# Altium PCB 6-layer.PcbDoc (part 1 of 2)
Units mm, origin at the board's own origin, x right, y up, seen from the top; angles counter-clockwise.
Board outline 36 x 29 mm, 6 copper layers (Top Layer, GND1, L3, L4, GND2, Bottom Layer), stack 0.804 mm thick; 122 components, 171 nets, 723 pads, 118 vias.
Unrouted connection lines stored in the file: 463.
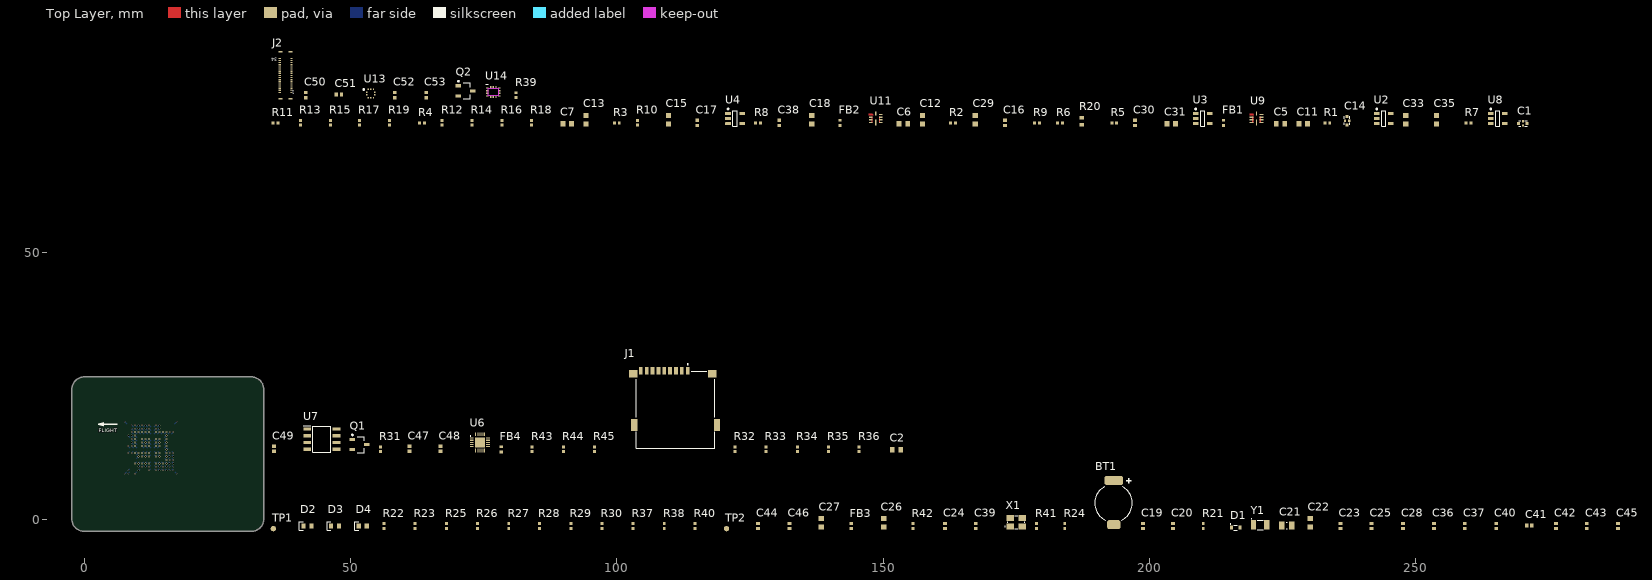
[diagram p0: Top Layer view]
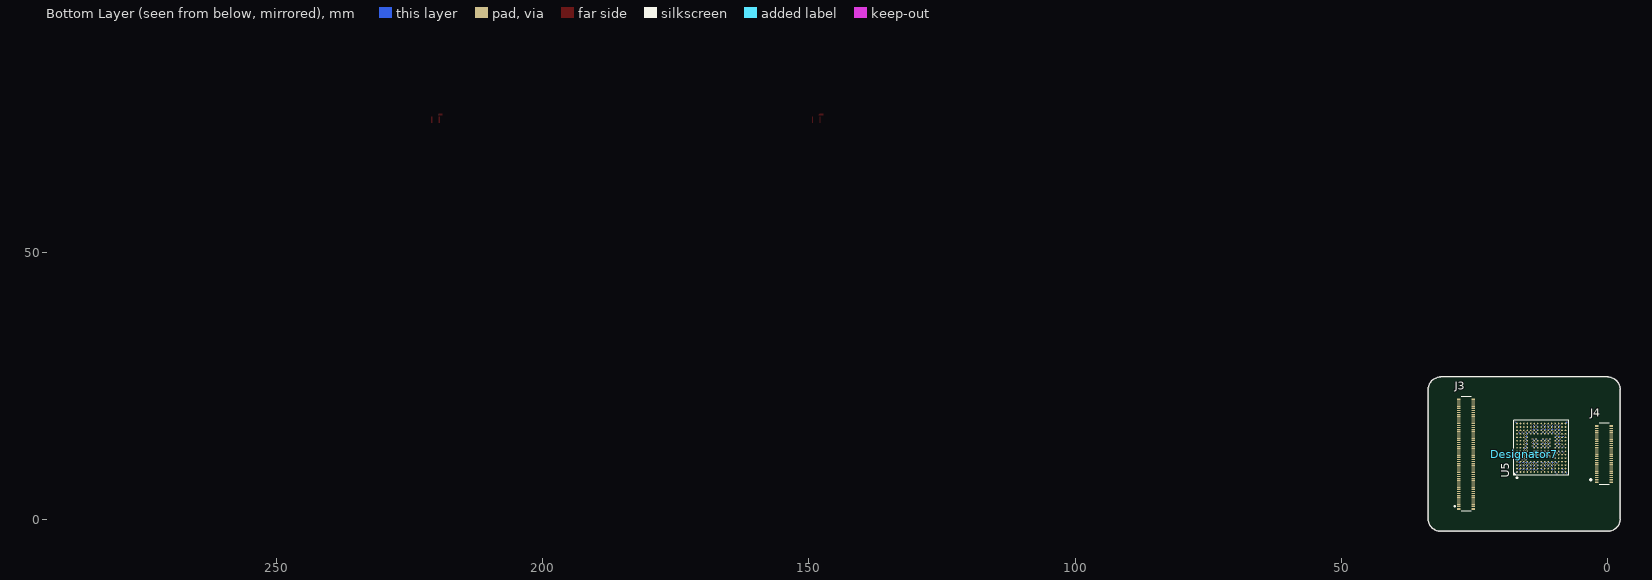
[diagram p1: Bottom Layer view, seen from below]
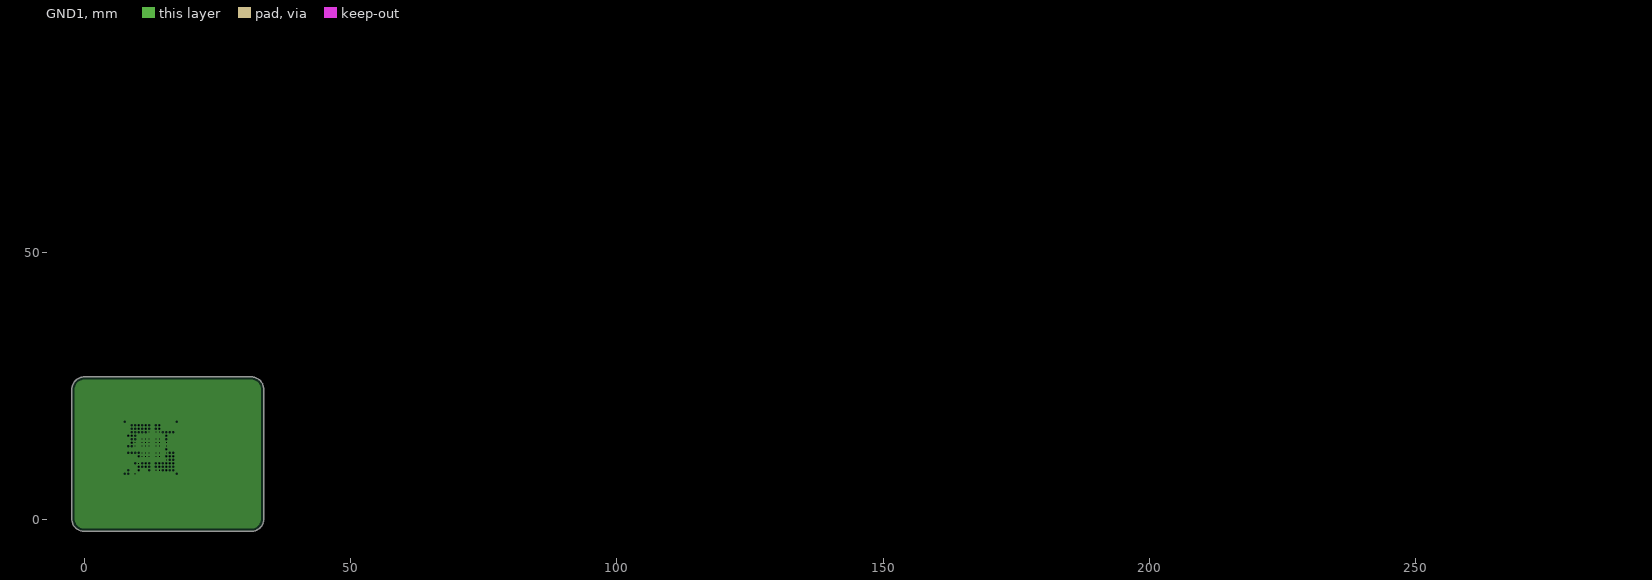
[diagram p2: GND1, clearances drawn from the general rule]
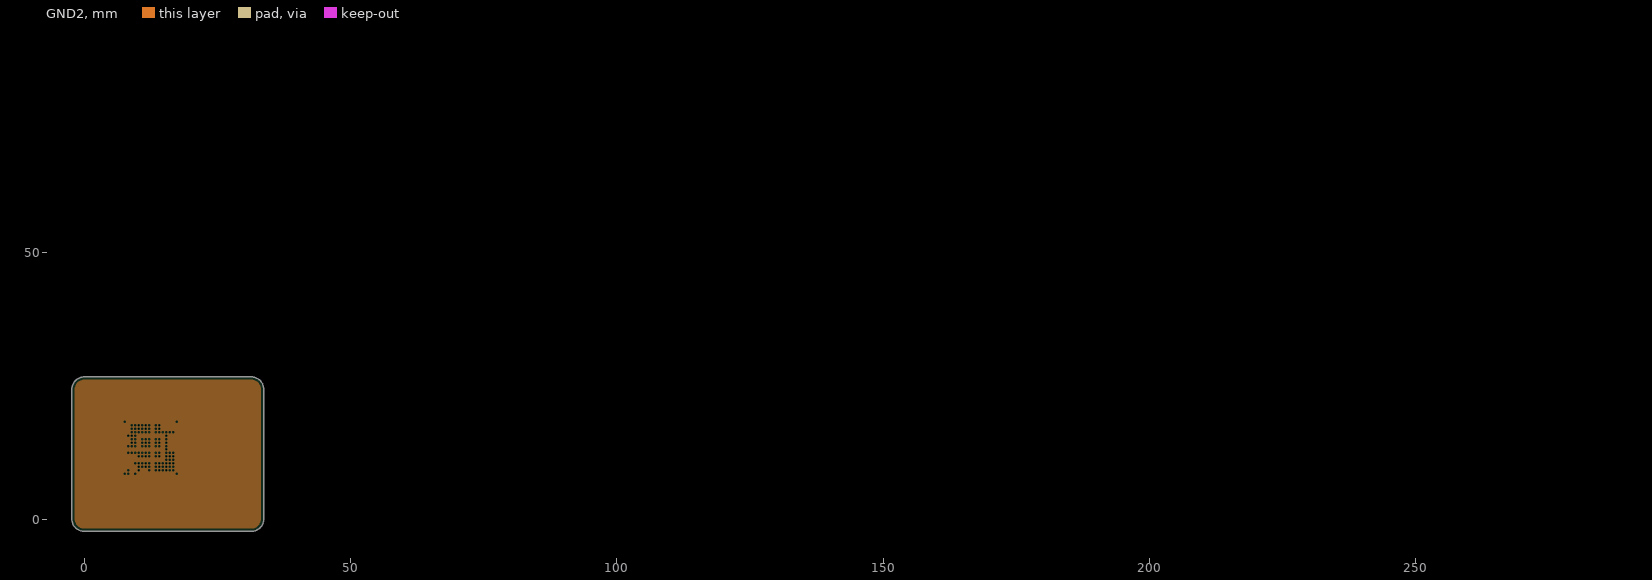
[diagram p3: GND2, clearances drawn from the general rule]

## Layer stack, top to bottom
Top Solder: solder mask 0.0152, Solder Resist, Dk 3.8
Top Layer: signal copper 0.035
Dielectric 1: prepreg 0.0764, NP-155F, Dk 3.91
GND1: plane copper 0.0152, net GND
Dielectric 2: core 0.075, NP-155F, Dk 3.99
L3: signal copper 0.0152
Dielectric 3: prepreg 0.0764, NP-155F, Dk 3.91
Dielectric 4: prepreg 0.218, NP-155F, Dk 4.4
Dielectric 5: prepreg 0.0764, NP-155F, Dk 3.91
L4: signal copper 0.0152
Dielectric 6: core 0.075, NP-155F, Dk 3.99
GND2: plane copper 0.0152
Dielectric 7: prepreg 0.0764, NP-155F, Dk 3.91
Bottom Layer: signal copper 0.035
Bottom Solder: solder mask 0.0152, Solder Resist, Dk 3.8

## Board outline
31.4,-2.3 ccw(c31.4,0) 33.7,0 33.7,24.4 ccw(c31.4,24.4) 31.4,26.7 0,26.7 ccw(c0,24.4) -2.3,24.4 -2.3,0 ccw(c0,0) 0,-2.3

## Design rules (kind name [scope] priority, off if disabled: settings)
Clearance Clearance_1 [WithinRoom(Room_BGA) AND IsVia vs WithinRoom(Room_BGA) AND OnBottomLayer] p1: gap=0.1 ignorepadtopadclearanceinfootprint=TRUE
Clearance Clearance_Clock [(InNet('ETH_REF_CLK') OR InNet('SPI1_SCK_SENSOR1_BMI330') OR InNet('SPI2_SCK_SENSOR2_ISM330') OR InNet('SPI3_SCK_SENSOR3_BMI088') OR InNet('SPI4_SCK_SENSOR4') OR InNet('SPI5_SCK_FRAM') OR InNet('SPI6_SCK_EXTERNAL1'))] p2: gap=0.32 ignorepadtopadclearanceinfootprint=TRUE
Clearance Clearance_High_Speed [(InNetClass('ETH_RMII_RX') OR InNetClass('ETH_RMII_TX') OR InNetClass('SDMMC') OR InNetClass('USB'))] p3: gap=0.22 ignorepadtopadclearanceinfootprint=TRUE
Clearance [All] p4: gap=0.16 ignorepadtopadclearanceinfootprint=TRUE
ComponentClearance ComponentClearanceMechanical [InComponent('Designator7')] p1: gap=-1 collisioncheckmode=3 verticalgap=-1 showdistances=FALSE
ComponentClearance [All] p2: gap=0.254 collisioncheckmode=3 verticalgap=0.254 showdistances=FALSE
DiffPairsRouting [InDifferentialPair('USB_D')] p1: maxlimit=0.13 minlimit=0.127 mostfreqgap=0.13 toplayer_mingap=0.13 toplayer_minwidth=0.1 toplayer_maxwidth=0.1 toplayer_prefwidth=0.1 midlayer1_minwidth=0.381 midlayer1_maxwidth=0.381 midlayer1_prefwidth=0.381 midlayer4_maxgap=0.127 midlayer4_prefgap=0.127 midlayer4_minwidth=0.087 midlayer4_maxwidth=0.381 midlayer4_prefwidth=0.113 bottomlayer_mingap=0.13 bottomlayer_minwidth=0.1 bottomlayer_maxwidth=0.1 bottomlayer_prefwidth=0.1 maxuncoupledlength=12.7
HoleToHoleClearance ViaHoleToHoleClearance [IsVia vs IsVia] p1: gap=0.2 allowstackedmicrovias=TRUE
HoleToHoleClearance [IsThruPin vs IsThruPin] p2: gap=0.45 allowstackedmicrovias=FALSE
MatchedLengths MatchedLengths_ETH_RX [InNetClass('ETH_RMII_RX')] p1: tolerance=1.27 checknetsindiffpair=FALSE checkdiffpairvsdiffpair=TRUE checkxsignals=TRUE checkothers=TRUE usedelayunits=TRUE delaytolerance=10.000000
MatchedLengths MatchedLengths_ETH_TX [InNetClass('ETH_RMII_TX')] p2: tolerance=1.27 checknetsindiffpair=FALSE checkdiffpairvsdiffpair=TRUE checkxsignals=TRUE checkothers=TRUE usedelayunits=TRUE delaytolerance=10.000000
MatchedLengths MatchedLengths_SDMMC [InNetClass('SDMMC')] p3: tolerance=1.27 checknetsindiffpair=FALSE checkdiffpairvsdiffpair=TRUE checkxsignals=TRUE checkothers=TRUE usedelayunits=TRUE delaytolerance=30.000000
MinimumSolderMaskSliver [All] p1: minsoldermaskwidth=0.1
PlaneClearance [All] p1: clearance=0.16
PlaneConnect [All] p1: planeconnectstyle=Direct reliefexpansion=0.508 reliefentries=4 reliefconductorwidth=0.254 reliefairgap=0.254
PolygonConnect [All] p1: connectstyle=Direct reliefconductorwidth=0.15 reliefentries=4 polygonreliefangle="45 Angle" airgapwidth=0.15
RoomDefinition Room_BGA [False vs False] p1: confinementstyle=ConfineIn formatcopy=TRUE lockcomponents=FALSE outline 7.625,18.275 17.375,18.275 17.375,8.525 7.625,8.525
RoutingVias [All] p1: holewidth=0.15 width=0.35 viastyle="Through Hole" minholewidth=0.15 minwidth=0.25 maxholewidth=0.2 maxwidth=0.35
SolderMaskExpansion [IsPad] p1: expansion=0.03 istentingtop=FALSE
SolderMaskExpansion SolderMaskExpansion_Vias [IsVia] p2: expansion=0.1 istentingtop=TRUE useseparateexpansions=TRUE expansionbottom=0.1 istentingbottom=TRUE
SolderMaskExpansion SolderMaskExpansion_1 [All] p3: expansion=0 istentingtop=FALSE
SupplyNets "Schematic Supply Nets_7" [InNet('VDD_3V3_SENSORS3')] p1: voltage=0.000
SupplyNets "Schematic Supply Nets_6" [InNet('FMU_VDD_3V3')] p2: voltage=0.000
SupplyNets "Schematic Supply Nets_5" [InNet('VDD_3V3_SD_CARD')] p3: voltage=0.000
SupplyNets "Schematic Supply Nets_4" [InNet('VDD_3V3_SENSORS2')] p4: voltage=0.000
SupplyNets "Schematic Supply Nets_3" [InNet('VDD_3V3_SENSORS1')] p5: voltage=0.000
SupplyNets "Schematic Supply Nets_2" [InNet('GND')] p6: voltage=0.000
SupplyNets "Schematic Supply Nets_1" [InNet('VDD_5V_IN')] p7: voltage=0.000
SupplyNets "Schematic Supply Nets" [InNet('VDD_3V3_SENSORS4')] p8: voltage=0.000
Width Width_Power [All] p1: maxlimit=0.5 minlimit=0.2 preferedwidth=0.2
Width [All] p2: maxlimit=0.5 minlimit=0.1 preferedwidth=0.107
24 further rules are at their usual default settings.

## Classes and differential pairs
net class UART4: UART4_RX UART4_TX
net class SPI5: SPI5_MISO_FRAM SPI5_MOSI_FRAM SPI5_nCS1_FRAM SPI5_SCK_FRAM
net class I2C4: I2C4_SCL_FMU I2C4_SDA_FMU
net class Power: FMU_VDD_3V3 FMU_VDD_5V SENSORS_VDD_5V VDD_3V3_SD_CARD VDD_3V3_SD_CARD_EN VDD_3V3_SENSORS1 VDD_3V3_SENSORS1_EN VDD_3V3_SENSORS2 VDD_3V3_SENSORS2_EN VDD_3V3_SENSORS3 VDD_3V3_SENSORS3_EN VDD_3V3_SENSORS4 VDD_3V3_SENSORS4_EN VDD_5V_IN
net class SPI1: SPI1_DRDY1_BMI330 SPI1_MISO_SENSOR1_BMI330 SPI1_MOSI_SENSOR1_BMI330 SPI1_nCS1_BMI330 SPI1_SCK_SENSOR1_BMI330
net class ETH_RMII_RX: ETH_CRS_DV ETH_RXD0 ETH_RXD1
net class ETH_RMII_SLOW: ETH_MDC ETH_MDIO ETH_POWER_EN
net class SDMMC: SDMMC2_CLK SDMMC2_CMD SDMMC2_D0 SDMMC2_D1 SDMMC2_D2 SDMMC2_D3
net class USB: USB_D_N USB_D_P
net class USART6: USART6_RX_FROM_IO__RC_INPUT USART6_TX_TO_IO__NC
net class USART3: USART3_RX_DEBUG USART3_TX_DEBUG
net class USART2: USART2_CTS_TELEM3 USART2_RTS_TELEM3 USART2_RX_TELEM3 USART2_TX_TELEM3
net class USART1: USART1_RX_GPS1 USART1_TX_GPS1
net class UART8: UART8_RX_GPS2 UART8_TX_GPS2
net class UART7: UART7_CTS_TELEM1 UART7_RTS_TELEM1 UART7_RX_TELEM1 UART7_TX_TELEM1
net class UART5: UART5_CTS_TELEM2 UART5_RTS_TELEM2 UART5_RX_TELEM2 UART5_TX_TELEM2
net class SPI6: SPI6_DRDY1_EXTERNAL1 SPI6_DRDY2_EXTERNAL1 SPI6_MISO_EXTERNAL1 SPI6_MOSI_EXTERNAL1 SPI6_nCS1_EXTERNAL1 SPI6_nCS2_EXTERNAL1 SPI6_nRESET_EXTERNAL1 SPI6_SCK_EXTERNAL1 SPIX_SYNC
net class SPI4: SPI4_DRDY1 SPI4_MISO_SENSOR4 SPI4_MOSI_SENSOR4 SPI4_nCS1 SPI4_SCK_SENSOR4
net class SPI3: SPI3_DRDY2_BMI088_INT3_GYRO SPI3_MISO_SENSOR3_BMI088 SPI3_MOSI_SENSOR3_BMI088 SPI3_nCS1_BMI088_ACCEL SPI3_nCS2_BMI088_GYRO SPI3_SCK_SENSOR3_BMI088
net class SPI2: SPI2_DRDY2_ISM330_INT2 SPI2_MISO_SENSOR2_ISM330 SPI2_MOSI_SENSOR2_ISM330 SPI2_nCS1_ISM330 SPI2_SCK_SENSOR2_ISM330
net class PWM: FMU_CH1 FMU_CH2 FMU_CH3 FMU_CH4 FMU_CH5 FMU_CH6 FMU_CH7 FMU_CH8
net class I2C3: I2C3_SCL_EXTERNAL1 I2C3_SDA_EXTERNAL1
net class I2C2: I2C2_SCL_BASE_GPS2_MAG_LED_PM2 I2C2_SDA_BASE_GPS2_MAG_LED_PM2
net class I2C1: I2C1_SCL_BASE_GPS1_MAG_LED_PM1 I2C1_SDA_BASE_GPS1_MAG_LED_PM1
net class ETH_RMII_TX: ETH_REF_CLK ETH_TX_EN ETH_TXD0 ETH_TXD1
net class CAN2: CAN2_RX CAN2_TX
net class CAN1: CAN1_RX CAN1_TX
component class Sensors: C50 C51 C52 C53 J2 Q2 R39 U13 U14
component class PAB: J3 J4
component class Memory: C2 C47 C48 C49 FB4 J1 Q1 R31 R32 R33 R34 R35 R36 R43 R44 R45 U6 U7
component class "FMU MCU": BT1 C19 C20 C21 C22 C23 C24 C25 C26 C27 C28 C36 C37 C39 C40 C41 C42 C43 C44 C45 C46 D1 D2 D3 D4 FB3 R21 R22 R23 R24 R25 R26 R27 R28 R29 R30 R37 R38 R40 R41 R42 TP1 TP2 U5 X1 Y1
component class Power: C1 C5 C6 C7 C11 C12 C13 C14 C15 C16 C17 C18 C29 C30 C31 C33 C35 C38 FB1 FB2 R1 R2 R3 R4 R5 R6 R7 R8 R9 R10 R11 R12 R13 R14 R15 R16 R17 R18 R19 R20 U2 U3 U4 U8 U9 U11
differential pair USB_D: +USB_D_P -USB_D_N

## Components (designator, comment, footprint, x,y, rotation, side; value= is the part's Value field where it differs from the comment)
BT1 "MS621FE-FL11E" MS621R 193.311,3.008 r90 top
C1 "NFM18PC104R1C3D" NFM18PC104R1C3_0603_NO_VIA 270.111,74.308 r0 top
C2 "10uF" CAPC1608X10N 152.511,13.008 r0 top
C5 "10uF" CAPC1608X10N 224.611,74.208 r0 top
C6 "10uF" CAPC1608X10N 153.811,74.208 r0 top
C7 "10uF" CAPC1608X10N 90.712,74.208 r0 top
C11 "10uF" CAPC1608X10N 228.911,74.208 r0 top
C12 "10uF" CAPC1608X10N 157.411,75.008 r90 top
C13 "10uF" CAPC1608X10N 94.212,75.008 r90 top
C14 "NFM18PC104R1C3D" NFM18PC104R1C3_0603_NO_VIA 237.111,74.808 r90 top
C15 "22uF" CAPC1608X10N 109.712,75.008 r90 top
C16 "0.1uF" CAPC1005X05N 172.911,74.408 r90 top
C17 "0.1uF" CAPC1005X05N 115.112,74.408 r90 top
C18 "22uF" CAPC1608X10N 136.611,75.008 r90 top
C19 "18pF/C0G" CAPC1005X05N 198.811,-1.292 r90 top
C20 "18pF/C0G" CAPC1005X05N 204.411,-1.292 r90 top
C21 "47uF" CAPC2012X14N 225.811,-1.192 r0 top
C22 "4.7uF" CAPC1608X10N 230.211,-0.692 r90 top
C23 "100nF" CAPC1005X05N 235.911,-1.292 r90 top
C24 "22pF/C0G" CAPC1005X05N 161.611,-1.292 r90 top
C25 "1uF" CAPC1005X05N 241.711,-1.292 r90 top
C26 "2.2uF/10V" CAPC1608X10N 150.111,-0.692 r90 top
C27 "2.2uF/10V" CAPC1608X10N 138.411,-0.692 r90 top
C28 "100nF" CAPC1005X05N 247.611,-1.292 r90 top
C29 "22uF" CAPC1608X10N 167.311,75.008 r90 top
C30 "0.1uF" CAPC1005X05N 197.311,74.408 r90 top
C31 "22uF" CAPC1608X10N 204.111,74.208 r0 top
C33 "10uF" CAPC1608X10N 248.111,75.008 r90 top
C35 "10uF" CAPC1608X10N 253.911,75.008 r90 top
C36 "1uF" CAPC1005X05N 253.411,-1.292 r90 top
C37 "100nF" CAPC1005X05N 259.211,-1.292 r90 top
C38 "0.1uF" CAPC1005X05N 130.511,74.408 r90 top
C39 "22pF/C0G" CAPC1005X05N 167.411,-1.292 r90 top
C40 "1uF" CAPC1005X05N 265.111,-1.292 r90 top
C41 "100nF" CAPC1005X05N 271.311,-1.192 r0 top
C42 "1uF" CAPC1005X05N 276.311,-1.292 r90 top
C43 "100nF" CAPC1005X05N 282.111,-1.292 r90 top
C44 "100nF" CAPC1005X05N 126.511,-1.292 r90 top
C45 "1uF" CAPC1005X05N 288.011,-1.292 r90 top
C46 "1uF" CAPC1005X05N 132.411,-1.292 r90 top
C47 "0.1uF" CAPC1005X05N 61.112,13.208 r90 top
C48 "0.1uF" CAPC1005X05N 66.912,13.208 r90 top
C49 "100n" CAPC1005X05N 35.612,13.208 r90 top
C50 "100nF" CAPC1005X05N 41.612,79.608 r90 top
C51 "100nF" CAPC1005X05N 47.812,79.708 r0 top
C52 "100nF" CAPC1005X05N 58.312,79.608 r90 top
C53 "100nF" CAPC1005X05N 64.212,79.608 r90 top
D1 "SOD-523" SODFL160X70-2N 216.211,-1.592 r0 top
D2 "RED" LED_0603_RED 41.912,-1.292 r0 top
D3 "GREEN" LED_0603_GREEN 47.112,-1.292 r0 top
D4 "BLUE" LED_0603_BLUE 52.312,-1.292 r0 top
Designator7 "Comment" PAB_LandPattern 15.7,12.2 r90 bottom locked
FB1 "120R@100M" INDC1005X06N 213.911,74.408 r90 top
FB2 "120R@100M" INDC1005X06N 141.911,74.408 r90 top
FB3 "60R@100M/300mA" INDC1005X06N 144.011,-1.292 r90 top
FB4 "120R@100M" INDC1005X06N 78.312,13.108 r90 top
J1 "TF-15x15" TF15X15 111.112,20.708 r0 top
J2 "BM20B(0.8)-34DS-0.4V" BM20B(0.8)-34DS-0.4V 37.812,83.308 r90 top
J3 "CONN HDR 100POS 0.4MM SMD GOLD" HIROSE_DF40C-100DP-0_4V51 26.6,12.2 r90 bottom
J4 "CONN HDR 50POS 0.4MM SMD GOLD" HIROSE_DF40C-50DP-0-4V51 0.7,12.2 r90 bottom
Q1 "AO3400A" SOT95P280X125-3N 51.712,14.008 r0 top
Q2 "AO3400A" SOT95P280X125-3N 71.612,80.408 r0 top
R1 "10K" RESC1005X04N 233.411,74.408 r0 top
R2 "10K" RESC1005X04N 163.111,74.408 r0 top
R3 "10K" RESC1005X04N 100.012,74.408 r0 top
R4 "10K" RESC1005X04N 63.412,74.408 r0 top
R5 "82K" RESC1005X04N 193.411,74.408 r0 top
R6 "18K" RESC1005X04N 183.211,74.408 r0 top
R7 "10K" RESC1005X04N 259.911,74.408 r0 top
R8 "82K" RESC1005X04N 126.511,74.408 r0 top
R9 "10K" RESC1005X04N 178.911,74.408 r0 top
R10 "18K" RESC1005X04N 103.912,74.408 r90 top
R11 "10K" RESC1005X04N 35.912,74.408 r0 top
R12 "10K" RESC1005X04N 67.212,74.408 r90 top
R13 "10K" RESC1005X04N 40.612,74.408 r90 top
R14 "10K" RESC1005X04N 72.812,74.408 r90 top
R15 "10K" RESC1005X04N 46.212,74.408 r90 top
R16 "10K" RESC1005X04N 78.412,74.408 r90 top
R17 "10K" RESC1005X04N 51.712,74.408 r90 top
R18 "10K" RESC1005X04N 84.012,74.408 r90 top
R19 "10K" RESC1005X04N 57.312,74.408 r90 top
R20 "220R" RESC1608X06N 187.311,74.708 r90 top
R21 "1K5" RESC1005X04N 210.111,-1.292 r90 top
R22 "1.5K" RESC1005X04N 56.312,-1.292 r90 top
R23 "1.5K" RESC1005X04N 62.112,-1.292 r90 top
R24 "10K" RESC1005X04N 184.111,-1.292 r90 top
R25 "1.5K" RESC1005X04N 68.012,-1.292 r90 top
R26 "1.5K" RESC1005X04N 73.812,-1.292 r90 top
R27 "1.5K" RESC1005X04N 79.712,-1.292 r90 top
R28 "1.5K" RESC1005X04N 85.512,-1.292 r90 top
R29 "1.5K" RESC1005X04N 91.412,-1.292 r90 top
R30 "1.5K" RESC1005X04N 97.212,-1.292 r90 top
R31 "2K" RESC1005X04N 55.612,13.108 r90 top
R32 "100K" RESC1005X04N 122.212,13.108 r90 top
R33 "100K" RESC1005X04N 128.011,13.108 r90 top
R34 "100K" RESC1005X04N 133.911,13.108 r90 top
R35 "100K" RESC1005X04N 139.711,13.108 r90 top
R36 "100K" RESC1005X04N 145.511,13.108 r90 top
R37 "1K5" RESC1005X04N 103.012,-1.292 r90 top
R38 "1K5" RESC1005X04N 108.912,-1.292 r90 top
R39 "2K" RESC1005X04N 81.112,79.608 r90 top
R40 "1K5" RESC1005X04N 114.712,-1.292 r90 top
R41 "R0402" RESC1005X04N 178.811,-1.292 r90 top
R42 "R0402" RESC1005X04N 155.611,-1.292 r90 top
R43 "2K" RESC1005X04N 84.112,13.108 r90 top
R44 "2K" RESC1005X04N 90.012,13.108 r90 top
R45 "2K" RESC1005X04N 95.812,13.108 r90 top
TP1 "TP_NOBOM" PAD_RND_1MM 35.512,-1.792 r90 top
TP2 "TP_NOBOM" PAD_RND_1MM 120.612,-1.792 r90 top
U2 "LP5907-3.3" SOT-23-5 244.011,75.208 r0 top
U3 "LP5907-3.3" SOT-23-5 210.011,75.208 r0 top
U4 "LP5907-3.3" SOT-23-5 122.212,75.208 r0 top
U5 "STM32H753IIK6" BGA176C65P15X15_1000X1000X60N 12.5,13.4 r90 bottom locked
U6 "SE050C2HQ1/Z01SDZ" "SOT1969-1 NXP" 74.312,14.408 r0 top
U7 "FM25V02A-G" SOT127P602X155-8N 44.612,15.008 r0 top
U8 "LP5907-3.3" SOT-23-5 265.411,75.208 r0 top
U9 "MPM3811" QFN2x2x1p6_MPM3811_MNP 220.111,75.208 r0 top
U11 "MPM3811" QFN2x2x1p6_MPM3811_MNP 148.611,75.208 r0 top
U13 "ICP-20100" BMP390 53.812,79.908 r0 top
U14 "BMI330" ICM-45686 76.812,80.208 r0 top
X1 "16MHz 15pF" OSCCC320X250X80 175.011,-0.592 r0 top
Y1 "32.768Khz 12.5pF" XTAL3215X80N-2N 220.811,-1.092 r0 top

## Footprints (in the part's own frame and the unit in brackets; to place one, negate y for a bottom-side part, rotate by r counter-clockwise, add the part's x,y. Pads: shape width x height; smd on the part's side, far side on the other; paste and mask are expansions set on the pad)
BGA176C65P15X15_1000X1000X60N [mm] "BGA, 176-Leads, Body 10.00x10.00mmx0.60mm, Pitch 0.65mm"
  round 0.3 smd: A1(-4.55,4.55) A2(-3.9,4.55) A3(-3.25,4.55) A4(-2.6,4.55) A5(-1.95,4.55) A6(-1.3,4.55) A7(-0.65,4.55) A8(0,4.55) A9(0.65,4.55) A10(1.3,4.55) A11(1.95,4.55) A12(2.6,4.55) A13(3.25,4.55) A14(3.9,4.55) A15(4.55,4.55) B1(-4.55,3.9) B2(-3.9,3.9) B3(-3.25,3.9) B4(-2.6,3.9) B5(-1.95,3.9) B6(-1.3,3.9) B7(-0.65,3.9) B8(0,3.9) B9(0.65,3.9) B10(1.3,3.9) B11(1.95,3.9) B12(2.6,3.9) B13(3.25,3.9) B14(3.9,3.9) B15(4.55,3.9) C1(-4.55,3.25) C2(-3.9,3.25) C3(-3.25,3.25) C4(-2.6,3.25) C5(-1.95,3.25) C6(-1.3,3.25) C7(-0.65,3.25) C8(0,3.25) C9(0.65,3.25) C10(1.3,3.25) C11(1.95,3.25) C12(2.6,3.25) C13(3.25,3.25) C14(3.9,3.25) C15(4.55,3.25) D1(-4.55,2.6) D2(-3.9,2.6) D3(-3.25,2.6) D4(-2.6,2.6) D5(-1.95,2.6) D6(-1.3,2.6) D7(-0.65,2.6) D8(0,2.6) D9(0.65,2.6) D10(1.3,2.6) D11(1.95,2.6) D12(2.6,2.6) D13(3.25,2.6) D14(3.9,2.6) D15(4.55,2.6) E1(-4.55,1.95) E2(-3.9,1.95) E3(-3.25,1.95) E4(-2.6,1.95) E12(2.6,1.95) E13(3.25,1.95) E14(3.9,1.95) E15(4.55,1.95) F1(-4.55,1.3) F2(-3.9,1.3) F3(-3.25,1.3) F4(-2.6,1.3) F6(-1.3,1.3) F7(-0.65,1.3) F8(0,1.3) F9(0.65,1.3) F10(1.3,1.3) F12(2.6,1.3) F13(3.25,1.3) F14(3.9,1.3) F15(4.55,1.3) G1(-4.55,0.65) G2(-3.9,0.65) G3(-3.25,0.65) G4(-2.6,0.65) G6(-1.3,0.65) G7(-0.65,0.65) G8(0,0.65) G9(0.65,0.65) G10(1.3,0.65) G12(2.6,0.65) G13(3.25,0.65) G14(3.9,0.65) G15(4.55,0.65) H1(-4.55,0) H2(-3.9,0) H3(-3.25,0) H4(-2.6,0) H6(-1.3,0) H7(-0.65,0) H8(0,0) H9(0.65,0) H10(1.3,0) H12(2.6,0) H13(3.25,0) H14(3.9,0) H15(4.55,0) J1(-4.55,-0.65) J2(-3.9,-0.65) J3(-3.25,-0.65) J4(-2.6,-0.65) J6(-1.3,-0.65) J7(-0.65,-0.65) J8(0,-0.65) J9(0.65,-0.65) J10(1.3,-0.65) J12(2.6,-0.65) J13(3.25,-0.65) J14(3.9,-0.65) J15(4.55,-0.65) K1(-4.55,-1.3) K2(-3.9,-1.3) K3(-3.25,-1.3) K4(-2.6,-1.3) K6(-1.3,-1.3) K7(-0.65,-1.3) K8(0,-1.3) K9(0.65,-1.3) K10(1.3,-1.3) K12(2.6,-1.3) K13(3.25,-1.3) K14(3.9,-1.3) K15(4.55,-1.3) L1(-4.55,-1.95) L2(-3.9,-1.95) L3(-3.25,-1.95) L4(-2.6,-1.95) L12(2.6,-1.95) L13(3.25,-1.95) L14(3.9,-1.95) L15(4.55,-1.95) M1(-4.55,-2.6) M2(-3.9,-2.6) M3(-3.25,-2.6) M4(-2.6,-2.6) M5(-1.95,-2.6) M6(-1.3,-2.6) M7(-0.65,-2.6) M8(0,-2.6) M9(0.65,-2.6) M10(1.3,-2.6) M11(1.95,-2.6) M12(2.6,-2.6) M13(3.25,-2.6) M14(3.9,-2.6) M15(4.55,-2.6) N1(-4.55,-3.25) N2(-3.9,-3.25) N3(-3.25,-3.25) N4(-2.6,-3.25) N5(-1.95,-3.25) N6(-1.3,-3.25) N7(-0.65,-3.25) N8(0,-3.25) N9(0.65,-3.25) N10(1.3,-3.25) N11(1.95,-3.25) N12(2.6,-3.25) N13(3.25,-3.25) N14(3.9,-3.25) N15(4.55,-3.25) P1(-4.55,-3.9) P2(-3.9,-3.9) P3(-3.25,-3.9) P4(-2.6,-3.9) P5(-1.95,-3.9) P6(-1.3,-3.9) P7(-0.65,-3.9) P8(0,-3.9) P9(0.65,-3.9) P10(1.3,-3.9) P11(1.95,-3.9) P12(2.6,-3.9) P13(3.25,-3.9) P14(3.9,-3.9) P15(4.55,-3.9) R1(-4.55,-4.55) R2(-3.9,-4.55) R3(-3.25,-4.55) R4(-2.6,-4.55) R5(-1.95,-4.55) R6(-1.3,-4.55) R7(-0.65,-4.55) R8(0,-4.55) R9(0.65,-4.55) R10(1.3,-4.55) R11(1.95,-4.55) R12(2.6,-4.55) R13(3.25,-4.55) R14(3.9,-4.55) R15(4.55,-4.55)
  silkscreen extent -5.75,-5.15 5.15,5.15, body extent -5,-5 5,5, height 0.49
BM20B(0.8)-34DS-0.4V [mm]
  rect 0.23x0.42 smd: 1(-3.2,-1.09) 2(-3.2,1.09) 3(-2.8,-1.09) 4(-2.8,1.09) 5(-2.4,-1.09) 6(-2.4,1.09) 7(-2,-1.09) 8(-2,1.09) 9(-1.6,-1.09) 10(-1.6,1.09) 11(-1.2,-1.09) 12(-1.2,1.09) 13(-0.8,-1.09) 14(-0.8,1.09) 15(-0.4,-1.09) 16(-0.4,1.09) 17(0,-1.09) 18(0,1.09) 19(0.4,-1.09) 20(0.4,1.09) 21(0.8,-1.09) 22(0.8,1.09) 23(1.2,-1.09) 24(1.2,1.09) 25(1.6,-1.09) 26(1.6,1.09) 27(2,-1.09) 28(2,1.09) 29(2.4,-1.09) 30(2.4,1.09) 31(2.8,-1.09) 32(2.8,1.09) 33(3.2,-1.09) 34(3.2,1.09)
  rect 0.3x0.75 smd: M1(-4.41,-0.925) M2(-4.41,0.925) M3(4.41,-0.925) M4(4.41,0.925)
  body extent -4.64,-1.12 4.64,1.18, height 0.79
BMP390 [mm]
  rect 0.275x0.25 smd mask+0: 1(-0.763,0.25) 2(-0.763,-0.25) 6(0.763,-0.25) 7(0.763,0.25)
  rect 0.25x0.275 smd mask+0: 3(-0.5,-0.763) 4(0,-0.763) 5(0.5,-0.763) 8(0.5,0.763) 9(0,0.763) 10(-0.5,0.763)
  silkscreen extent -1.45,0.63 -1.2,0.87, body extent -1,-1 1,1, height 0.8
CAPC1005X05N [mm] "Chip Capacitor, 2-Leads, Body 1.00x0.50mm, IPC Medium Density"
  rect 0.6x0.72 smd: 1(-0.48,0) 2(0.48,0)
  body extent -0.55,-0.35 0.55,0.35, height 0.5
CAPC1608X10N [mm] "Chip Capacitor, 2-Leads, Body 1.60x0.80mm, IPC Medium Density"
  rect 0.9x1 smd: 1(-0.8,0) 2(0.8,0)
  body extent -0.85,-0.5 0.85,0.5, height 1
CAPC2012X14N [mm] "Chip Capacitor, 2-Leads, Body 2.00x1.25mm, IPC Medium Density"
  rect 1.05x1.45 smd: 1(-0.925,0) 2(0.925,0)
  silkscreen extent -0.1,-0.63 0.1,0.63, body extent -1.1,-0.72 1.1,0.72, height 1.45
HIROSE_DF40C-50DP-0-4V51 [mm] "Connector, Vertical Board to Board Receptacle; 50 pin, 11.52 mm L X 1.85 mm W X 1.29 mm H body"
  rrect50% 0.23x0.66 smd paste-0.018: 1(-4.8,1.355) 2(-4.8,-1.355) 3(-4.4,1.355) 4(-4.4,-1.355) 5(-4,1.355) 6(-4,-1.355) 7(-3.6,1.355) 8(-3.6,-1.355) 9(-3.2,1.355) 10(-3.2,-1.355) 11(-2.8,1.355) 12(-2.8,-1.355) 13(-2.4,1.355) 14(-2.4,-1.355) 15(-2,1.355) 16(-2,-1.355) 17(-1.6,1.355) 18(-1.6,-1.355) 19(-1.2,1.355) 20(-1.2,-1.355) 21(-0.8,1.355) 22(-0.8,-1.355) 23(-0.4,1.355) 24(-0.4,-1.355) 25(0,1.355) 26(0,-1.355) 27(0.4,1.355) 28(0.4,-1.355) 29(0.8,1.355) 30(0.8,-1.355) 31(1.2,1.355) 32(1.2,-1.355) 33(1.6,1.355) 34(1.6,-1.355) 35(2,1.355) 36(2,-1.355) 37(2.4,1.355) 38(2.4,-1.355) 39(2.8,1.355) 40(2.8,-1.355) 41(3.2,1.355) 42(3.2,-1.355) 43(3.6,1.355) 44(3.6,-1.355) 45(4,1.355) 46(4,-1.355) 47(4.4,1.355) 48(4.4,-1.355) 49(4.8,1.355) 50(4.8,-1.355)
  rrect50% 0.35x0.66 smd paste-0.024: M1(-5.275,1.355) M2(-5.275,-1.355) M3(5.275,1.355) M4(5.275,-1.355)
  silkscreen extent -5.76,-0.93 5.76,2.65, body extent -5.75,-1.49 5.77,1.48, height 1.13
HIROSE_DF40C-100DP-0_4V51 [mm] "Connector, Vertical Board to Board Plug; 104 pin, 21.52 mm L X 1.85 mm W X 1.29 mm H body"
  rect 0.23x0.66 smd: 1(-9.8,1.355) 2(-9.8,-1.355) 3(-9.4,1.355) 4(-9.4,-1.355) 5(-9,1.355) 6(-9,-1.355) 7(-8.6,1.355) 8(-8.6,-1.355) 9(-8.2,1.355) 10(-8.2,-1.355) 11(-7.8,1.355) 12(-7.8,-1.355) 13(-7.4,1.355) 14(-7.4,-1.355) 15(-7,1.355) 16(-7,-1.355) 17(-6.6,1.355) 18(-6.6,-1.355) 19(-6.2,1.355) 20(-6.2,-1.355) 21(-5.8,1.355) 22(-5.8,-1.355) 23(-5.4,1.355) 24(-5.4,-1.355) 25(-5,1.355) 26(-5,-1.355) 27(-4.6,1.355) 28(-4.6,-1.355) 29(-4.2,1.355) 30(-4.2,-1.355) 31(-3.8,1.355) 32(-3.8,-1.355) 33(-3.4,1.355) 34(-3.4,-1.355) 35(-3,1.355) 36(-3,-1.355) 37(-2.6,1.355) 38(-2.6,-1.355) 39(-2.2,1.355) 40(-2.2,-1.355) 41(-1.8,1.355) 42(-1.8,-1.355) 43(-1.4,1.355) 44(-1.4,-1.355) 45(-1,1.355) 46(-1,-1.355) 47(-0.6,1.355) 48(-0.6,-1.355) 49(-0.2,1.355) 50(-0.2,-1.355) 51(0.2,1.355) 52(0.2,-1.355) 53(0.6,1.355) 54(0.6,-1.355) 55(1,1.355) 56(1,-1.355) 57(1.4,1.355) 58(1.4,-1.355) 59(1.8,1.355) 60(1.8,-1.355) 61(2.2,1.355) 62(2.2,-1.355) 63(2.6,1.355) 64(2.6,-1.355) 65(3,1.355) 66(3,-1.355) 67(3.4,1.355) 68(3.4,-1.355) 69(3.8,1.355) 70(3.8,-1.355) 71(4.2,1.355) 72(4.2,-1.355) 73(4.6,1.355) 74(4.6,-1.355) 75(5,1.355) 76(5,-1.355) 77(5.4,1.355) 78(5.4,-1.355) 79(5.8,1.355) 80(5.8,-1.355) 81(6.2,1.355) 82(6.2,-1.355) 83(6.6,1.355) 84(6.6,-1.355) 85(7,1.355) 86(7,-1.355) 87(7.4,1.355) 88(7.4,-1.355) 89(7.8,1.355) 90(7.8,-1.355) 91(8.2,1.355) 92(8.2,-1.355) 93(8.6,1.355) 94(8.6,-1.355) 95(9,1.355) 96(9,-1.355) 97(9.4,1.355) 98(9.4,-1.355) 99(9.8,1.355) 100(9.8,-1.355)
  rect 0.35x0.66 smd: M1(-10.275,1.355) M2(-10.275,-1.355) M3(10.275,1.355) M4(10.275,-1.355)
  silkscreen extent -10.76,-0.93 10.76,2.28, body extent -10.76,-1.48 10.76,1.49, height 1.13
ICM-45686 [mm]
  rect 0.475x0.25 smd: 1(-1.162,0.75) 2(-1.162,0.25) 3(-1.162,-0.25) 4(-1.162,-0.75) 8(1.162,-0.75) 9(1.162,-0.25) 10(1.162,0.25) 11(1.162,0.75)
  rect 0.25x0.475 smd: 5(-0.5,-0.913) 6(0,-0.912) 7(0.5,-0.913) 12(0.5,0.913) 13(0,0.913) 14(-0.5,0.913)
  Top Layer keep-out region: -0.925,0.675 0.925,0.675 0.925,-0.675 -0.925,-0.675
  silkscreen extent -1.45,1.43 -0.97,1.43, body extent -1.5,-1.19 1.5,1.19, height 0.87
INDC1005X06N [mm] "Chip Inductor, 2-Leads, Body 1.00x0.50mm, IPC Medium Density"
  rect 0.54x0.62 smd: 1(-0.48,0) 2(0.48,0)
  body extent -0.53,-0.28 0.53,0.27, height 0.55
LED_0603_BLUE [mm]
  rrect25% 0.8x1 smd: A(0.75,0) K(-0.75,0)
  silkscreen extent -1.5,-0.8 -0.8,0.8, body extent -0.8,-0.4 0.8,0.4, height 0.6
LED_0603_GREEN [mm]
  rrect25% 0.8x1 smd: A(0.75,0) K(-0.75,0)
  silkscreen extent -1.5,-0.8 -0.8,0.8, body extent -0.8,-0.4 0.8,0.4, height 0.6
LED_0603_RED [mm]
  rrect25% 0.8x1 smd: A(0.75,0) K(-0.75,0)
  silkscreen extent -1.5,-0.8 -0.8,0.8, body extent -0.8,-0.4 0.8,0.4, height 0.6
MS621R [mm] "MS621FE"
  rrect50% 1.7x3.5 smd: 1(4.25,0)
  rrect50% 1.7x2.5 smd: 2(-4.05,0)
  silkscreen extent -3.18,-3.47 4.7,3.57, body extent -4.5,-3.36 4.7,3.44, height 2.45
NFM18PC104R1C3_0603_NO_VIA [mm]
  rrect50% 0.6x0.6 smd: 1(-0.8,0) 3(0.8,0)
  rect 0.4x0.4 smd mask+0.102: 2(0,-0.4) 2(0,0.4)
  silkscreen extent -0.8,-0.5 0.8,0.5, body extent -0.8,-0.41 0.8,0.41, height 0.6
OSCCC320X250X80 [mm] "Oscillator, Corner Concave; 23.20 mm L X 2.50 mm W X 0.60 mm H body"
  rect 1.4x1.15 smd: 1(-1.1,-0.8) 2(1.1,-0.8) 3(1.1,0.8) 4(-1.1,0.8)
  silkscreen extent -2.16,-1.25 1.6,1.25, body extent -1.6,-1.25 1.6,1.25, height 2.6
PAB_LandPattern [mm] "Raspberry Pi CM5 Land Pattern for Connectors and Screw Holes"
PAD_RND_1MM [mm]
  round 1 smd paste-0.5 mask+0: 1(0,0)
QFN2x2x1p6_MPM3811_MNP [mm]
  round 0.025 smd: 1(-0.9,0.75)
  rect 0.7x0.25 smd: 2(-0.95,0.25) 3(-0.95,-0.25) 4(-0.95,-0.75) 6(0.95,-0.75) 7(0.95,-0.25) 8(0.95,0.25) 9(0.95,0.75)
  rect 0.25x1.1 smd: 5(0,-0.75)
  rect 0.25x0.7 smd: 10(0,0.95)
  Top Layer region: 0.6,-0.875 0.85,-0.875 0.85,0.375 0.6,0.375
  Top Layer region: -0.825,-0.875 -0.575,-0.875 -0.575,0.375 -0.825,0.375
  body extent -1,-1 1,1, height 1.6
RESC1005X04N [mm] "Chip Resistor, 2-Leads, Body 1.00x0.50mm, IPC Medium Density"
  rect 0.55x0.55 smd: 1(-0.45,0) 2(0.45,0)
  body extent -0.53,-0.27 0.53,0.28, height 0.4
RESC1608X06N [mm] "Chip Resistor, 2-Leads, Body 1.55x0.85mm, IPC Medium Density"
  rect 0.65x0.9 smd: 1(-0.675,0) 2(0.675,0)
  body extent -0.8,-0.45 0.8,0.45, height 0.6
SODFL160X70-2N [mm] "SODFL, 2-Leads, Body 0.80x1.60mm, IPC Medium Density (SOD-523)"
  rect 0.6x0.75 smd: A(0.775,0) C(-0.775,0)
  silkscreen extent -1.02,-0.5 0.33,0.72, body extent -0.8,-0.45 0.8,0.45, height 0.7
SOT95P280X125-3N [mm] "SOT23, 3-Leads, Body 2.92x2.80mm, Pitch 0.95mm, IPC Medium Density"
  rect 1x0.6 smd: 1(-1.35,0.95) 2(-1.35,-0.95) 3(1.35,0)
  silkscreen extent -1.47,-1.5 0.85,1.92, body extent -1.5,-1.55 1.5,1.55, height 1.25
SOT127P602X155-8N [mm]
  rect 1.45x0.6 smd: 1(-2.75,1.905) 2(-2.75,0.635) 3(-2.75,-0.635) 4(-2.75,-1.905) 5(2.75,-1.905) 6(2.75,-0.635) 7(2.75,0.635) 8(2.75,1.905)
  silkscreen extent -3.47,-2.44 1.68,2.55, body extent -3.01,-2.44 3.01,2.44, height 1.55
"SOT1969-1 NXP" [mm] "For SE050/SE051"
  rect 0.725x0.2 smd paste+0 mask+0.05: 1(-1.538,0.8) 2(-1.538,0.4) 3(-1.538,0) 4(-1.538,-0.4) 5(-1.538,-0.8) 11(1.538,-0.8) 12(1.538,-0.4) 13(1.538,0) 14(1.538,0.4) 15(1.538,0.8)
  rect 0.2x0.725 smd paste+0 mask+0.05: 6(-0.8,-1.538) 7(-0.4,-1.538) 8(0,-1.538) 9(0.4,-1.538) 10(0.8,-1.538) 16(0.8,1.538) 17(0.4,1.538) 18(0,1.538) 19(-0.4,1.538) 20(-0.8,1.538)
  rect 1.9x1.9 smd paste-2539.97 mask+0.05: EP(0,0)
  silkscreen extent -1.83,1.17 -1.72,1.28, body extent -1.5,-1.5 1.5,1.5, height 0.33
SOT-23-5 [mm] "SOT23, 5-Leads, Body 2,90x2,80mm, Pitch 0,95mm, IPC Medium Density"
  rrect25% 1.05x0.6 smd: 1(-1.325,0.95) 2(-1.325,0) 3(-1.325,-0.95) 4(1.325,-0.95) 5(1.325,0.95)
  silkscreen extent -1.45,-1.45 0.4,1.92, body extent -1.4,-1.45 1.4,1.45, height 1.45
TF15X15 [mm]
  rect 0.7x1.4 smd: 1(2.2,7.175) 2(1.1,7.175) 3(0,7.175) 4(-1.1,7.175) 5(-2.2,7.175) 6(-3.3,7.175) 7(-4.4,7.175) 8(-5.5,7.175) 9(-6.6,7.175)
  round 0.45 hole 0.9 unplated: 14(-5,-3.425) 15(3,-3.425)
  rect 1.6x1.4 smd: MP1(-8.05,6.575) MP2(6.8,6.575)
  rect 1.2x2.2 smd: MP3(-7.8,-3.025) MP4(7.7,-3.025)
  silkscreen extent -7.43,-7.42 7.33,8.47, body extent -8.1,-7.42 8,7.57, height 1.92
XTAL3215X80N-2N [mm] "3215 crystal"
  rect 1x1.8 smd paste+0 mask+0.04: 1(-1.25,0) 2(1.25,0)
  silkscreen extent -1.67,-0.9 0.58,1.17, body extent -1.6,-0.75 1.6,0.75, height 0.9

## Part data
BT1: library part BATTERY_SINGLE-2, "MS Lihium Rechargeable Battery, 3 V, -20 to 60 degC, Tray", Capacity=5.5mAh, Manufacturer=SeikoInstruments, Output Voltage=3V, Battery Size=621, Brand=SeikoInstrumentsMicroEnergy, Chemistry=Lithium, Datasheet URL=http://datasheet.octopart.com/MS621FE-FL11E-Seiko-datasheet-5320152.pdf, Datasheet Version=Jan-08, Diameter=6.8mm, Factory Pack Quantity=100, Height=2.1mm, Manufacturer URL=http://www.sii.co.jp/en/, Mounting Style=WithLeads, Orientation=Vertical, Packaging=Tray, Product Category=CoinCellBattery, Rechargeable/Non-Rechargeable=Rechargeable, RoHS=NotApplicable, Series=MS, Termination Style=ThroughHole, Type=CoinCellBatterywithLeads, Unit Weight=0.008113oz
C1 C14: "Large Current 3 Terminals Low ESL Chip Multilayer Ceramic Capacitors for General Purpose, 0603, 0.10uF, 20%, 16V", Capacitance=100nF, Case Code (Imperial)=0603, Case Code (Metric)=1608, Current=2A, DC Resistance (DCR)=30mR, Insulation Resistance=1GR, Max Operating Temperature=125°C, Max Voltage Rating (DC)=16V, Min Operating Temperature=-55°C, Package Quantity=4000, Tolerance=20%, Case/Package=0603, Current Rating=2A, Depth=0.8mm, Height=0.6mm, Lead Free="Lead Free", Length=1.6mm, Max Current Rating=2A, Mount=PCB, Packaging="Tape and Reel", Radiation Hardening=No, REACH SVHC="No SVHC", Termination=Flat, Voltage=16V, Voltage Rating=16V, Voltage Rating (DC)=16V, Width=0.8mm
C2 C5 C6 C7 C11 C12 C13 C15 C18 C22 C26 C27 C29 C31 C33 C35: library part CAP_0603, "Capacitor SMD 0603"
C16 C17 C19 C20 C23 C24 C25 C28 C30 C36 C37 C38 C39 C40 C41 C42 C43 C44 C45 C46 C47 C48 C49 C50 C51 C52 C53: library part CAP_0402, "Capacitor SMD 0402"
C21: library part CAP_0805, "Capacitor SMD 0805"
D1: library part 1d6ec82d83fb6aee721767c19dac4b9, "DIODE SCHOTTKY SOD523", Forward Current=200mA, Manufacturer="Diodes Inc.", Manufacturer Part Number=SDM20U30-7, Max Junction Temp=+125°C, Max Repetitive Reverse Voltage=30V, Max Surge Forward Current=1A, Package=SOD523, Peak Reverse Current=150uA, Temperature="-65°C to +125°C", Temperature Range Low=-65°C, Automotive=Yes, Automotive Grade="Grade 1", Category=Diode, ComponentLink2Description=Datasheet, ComponentLink2URL=https://www.diodes.com/assets/Datasheets/ds30397.pdf, Device Class L1="Discrete Semiconductors", Device Class L2=Diodes, Device Class L3="Schottky Diodes", Digikey Description="DIODE SCHOTTKY 30V 200MA SOD523", Footprint Url=https://www.diodes.com/assets/Package-Files/SOD523.pdf, Height=0.65mm, Lead Free=Yes, Mouser Description="SDM20U30 Series 20 V 200 mA Surface Mount Schottky Barrier Diode - SOD-523", Octopart=https://octopart.com/sdm20u30-7-diodes+inc.-333874, Reverse Voltage=30V, RoHS=TRUE, Temperature Range High=+125°C
D2: library part LED_0603_RED, "LED 0603 RED SMD"
D3: library part LED_0603_GREEN, "LED 0603 GREEN SMD"
D4: library part LED_0603_BLUE, "LED 0603 BLUE SMD"
FB1 FB2 FB3 FB4: library part FB_0402, "Ferrite Bead SMD 0402"
J1: "-25℃~+85℃ 2mm Connector and Ejector MicroSD Card (TF Card) Push-Push SMD SD Card / Memory Card Connector ROHS"
J2: library part "IMU PCB connector", "34 Position Connector Header, Outer Shroud Contacts Surface Mount Gold"
J3: library part CONN_HDR_2X50_PLUG_0.4MM_SMD, Manufacturer="Hirose Electric Co Ltd", Manufacturer Part Number=DF40C-100DP-0.4V(51), Operating Temperature="-65°C ~ 85°C", Supplier Part Number 1=H11614CT-ND, Category="Connectors, Interconnects", ComponentLink1Description=https://www.digikey.com/product-detail/en/hirose-electric-co-ltd/DF40C-100DP-0.4V-51/H11614CT-ND/1969494, ComponentLink1URL=https://www.digikey.com/product-detail/en/hirose-electric-co-ltd/DF40C-100DP-0.4V-51/H11614CT-ND/1969494, Mounting Type="Surface Mount", Number of Positions=100, Number of Rows=2, Packaging="Cut Tape (CT)", Part Status=Active, Pitch="0.016\" (0.40mm)", Pricing 1="1=1.96 (USD)", Stock 1=27593, Supplier 1=Digi-Key, System=Connector
J4: library part CONN_HDR_2X25_PLUG_0.4MM_SMD, Manufacturer="Hirose Electric Co Ltd", Manufacturer Part Number=DF40C-50DP-0.4V(51), Operating Temperature="-65°C ~ 85°C", Supplier Part Number 1=H11626CT-ND, Category="Connectors, Interconnects", ComponentLink1Description=https://www.digikey.com/products/en/connectors-interconnects/rectangular-connectors-arrays-edge-type-mezzanine-board-to-board/308?k=DF40C-50DP-0.4V51&k=&pkeyword=DF40C-50DP-0.4V51&pv7=2&sf=0&quantity=&ColumnSort=0&page=1&pageSize=25, ComponentLink1URL=https://www.digikey.com/products/en/connectors-interconnects/rectangular-connectors-arrays-edge-type-mezzanine-board-to-board/308?k=DF40C-50DP-0.4V51&k=&pkeyword=DF40C-50DP-0.4V51&pv7=2&sf=0&quantity=&ColumnSort=0&page=1&pageSize=25, Mounting Type="Surface Mount", Number of Positions=50, Number of Rows=2, Packaging="Cut Tape (CT)", Part Status=Active, Pitch="0.016\" (0.40mm)", Pricing 1="1=1.12, 10=0.982, 25=0.924, 50=0.8856, 100=0.847, 250=0.77, 500=0.693, 1000=0.616 (USD)", Stock 1=57993, Supplier 1=Digi-Key, System=Connector
Q1: "MOSFET N-CH 30V 5.7A SOT23", Case/Package=SOT-23, Continuous Drain Current (ID)=5.7A, Drain to Source Voltage (Vdss)=30V, Gate to Source Voltage (Vgs)=12V, Input Capacitance=630pF, Max Operating Temperature=150°C, Max Power Dissipation=1.4W, Min Operating Temperature=-55°C, Lead Free="Lead Free", Mount="Surface Mount", Number of Elements=1, Number of Pins=3, Packaging="Tape and Reel", Power Dissipation=1.4W, Radiation Hardening=No, Rds On Max=26.5mR
Q2: library part 0a9ea7c96deaaede766a5b531c28de0, "MOSFET N-CH 30V 5.7A SOT23", Case/Package=SOT-23, Continuous Drain Current (ID)=5.7A, Drain to Source Voltage (Vdss)=30V, Gate to Source Voltage (Vgs)=12V, Input Capacitance=630pF, Max Operating Temperature=150°C, Max Power Dissipation=1.4W, Min Operating Temperature=-55°C, Lead Free="Lead Free", Mount="Surface Mount", Number of Elements=1, Number of Pins=3, Packaging="Tape and Reel", Power Dissipation=1.4W, Radiation Hardening=No, Rds On Max=26.5mR
R1 R2 R3 R4 R5 R6 R7 R8 R9 R10 R11 R12 R13 R14 R15 R16 R17 R18 R19 R21 R22 R23 R24 R25 R26 R27 R28 R29 R30 R31 R32 R33 R34 R35 R36 R37 R38 R39 R40 R41 R42 R43 R44 R45: library part RES_0402, "Resistor SMD 0402"
R20: library part RES_0603, "Resistor SMD 0603"
TP1 TP2: library part TEST_POINT_RND_1MM, "Test Point Round 1mm (NO BOM)"
U2 U3 U4 U8: "82dB@(1kHz) 250mA Fixed 3.3V Positive 5.5V SOT-23-5 Voltage Regulators - Linear, Low Drop Out (LDO) Regulators ROHS"
U5: library part f2632c7e739cd93bf56a941e5fc9246, "UFBGA 10X10X0.6 176+", Ambient Temperature Range High=+85°C, Ambient Temperature Range Low=-40°C, Frequency=400MHz, Manufacturer=STMicroelectronics, Max Junction Temp=+125°C, Max Supply Voltage=3.6V, Min Supply Voltage=1.62V, Package=UFBGA176+25-A0E7, Temperature="-40°C to +125°C", Automotive=No, Category=IC, ComponentLink2Description=Datasheet, ComponentLink2URL=https://www.st.com/resource/en/datasheet/stm32h753ii.pdf, Core Architecture="ARM Cortex-M7", Data Bus Width=32bits, Device Class L1="Integrated Circuits (ICs)", Device Class L2="Embedded Processors and Controllers", Device Class L3=Microcontrollers, Digikey Description="UFBGA 10X10X0.6 176+", Height=0.6mm, Interface=I2C,SPI,UART,USART,CAN,USB,LIN,IrDA,Ethernet,I2S,Other, Ipc Land Pattern Name=BGA225N65P15X15_1000X1000X60, Lead Free=Yes, Manufacturer Part Number=STM32H753IIK6, Memory Size=2MBytes, Memory Type=FLASH, Mouser Description="MCU 32-Bit STM32 ARM Cortex M7 RISC 2MB Flash 1.8V/2.5V/3.3V 176-Pin UFBGA Tray", Number Of A/D Converters=3, Number Of Adc Channels=36, Number Of Cores=1, Number Of Ethernet Channels=1, Number Of I2C Channels=4, Number Of I/Os=140, Number Of Pwm Channels=42, Number Of Spi Channels=6, Number Of Timers/Counters=20, Number Of Uart Channels=9, Number Of Usb Channels=2, Octopart=https://octopart.com/stm32h753iik6-stmicroelectronics-84735750, Ram Size=1MBytes, RoHS=TRUE, Temperature Range High=+125°C, Temperature Range Low=-40°C
U6: library part 477818e52a7d8a150ec960bcaa5cafa, "ECC RSA AES DES MIFARE KDF CL-IF"
U7: "NVRAM NVRAM FRAM Memory Serial", Manufacturer_Name=Infineon, Mouser Part Number=727-FM25V02A-G, Arrow Part Number=FM25V02A-G, Arrow Price/Stock=https://www.arrow.com/en/products/fm25v02a-g/infineon-technologies-ag?region=europe, Datasheet Link=https://componentsearchengine.com/Datasheets/1/FM25V02A-G.pdf, Geometry.Height=1.549mm, Manufacturer_Part_Number=FM25V02A-G, Mouser Price/Stock=https://www.mouser.co.uk/ProductDetail/Infineon-Technologies/FM25V02A-G?qs=IxCaM9nJKKU1F7p7SsPN2Q%3D%3D
U9 U11: "Non-Isolated PoL Module DC DC Converter 1 Output 0.6 ~ 3.3V 1A 2.3V - 5.5V Input"
U13: library part 2c5c2094cf923c2d68761797ff94764, "ICP-20100 Barometric Pressure and Temperature Sensor IC Digital Output 1.8V/3.3V 10-Pin LGA T/R", Min Operating Temperature=-40°C, Length=2mm, Max Length=2.08mm, Max Thickness=800µm, Max Width=2.08mm, Min Length=1.92mm, Min Thickness=640µm, Min Width=1.92mm, NexarPartId=111934633, Width=2mm
U14: "Bosch Sensortec Accelerometer, Gyroscope, Temperature, 3 Axis Sensor I²C, I3C℠, SPI Output"
X1: library part TSX-3225_24.0000MF15X-AC, "Crystal SMD 24MHz 10PPM 7pF 3225", Manufacturer=Epson, Manufacturer Part Number="TSX-3225 24.0000MF15X-AC"
Y1: library part c23a69dc6c9e2f18f2079038eb95dd1, "NX3215SA-32.768K-STD-MUA-14 Parallel - Fundamental Quartz Crystal, 0.032768MHz Nom", Case/Package=SMD/SMT, ESR (Equivalent Series Resistance)=70kΩ, Frequency=32.768kHz, Frequency Tolerance=0.002%, Load Capacitance=6pF, Max Operating Temperature=85°C, Min Operating Temperature=-40°C, Height=889µm, Length=3.2004mm, Mount="Surface Mount", NexarPartId=22488149, Number of Pins=2, Packaging="Tape & Reel (TR)", RoHS=Compliant, Width=1.4986mm

## Via types
v1: diameter 0.35, hole 0.15, Top Layer to Bottom Layer, tented both sides, 118 vias

## Nets (pads, with @x,y where several pads share a name; then routed paths per layer and width w, separated by ;. In a path a pad name is that pad's centre, name@x,y a point inside that pad or via, vN(x,y) a via of type N, cw(c..) or ccw(c..) an arc to the next point about the centre after c; other vN are vias at no path point)
ADC1_3V3: J3.92 U5.M5 | length 0.5
  Bottom Layer w0.2: U5.M5 v1(10.225,11.775)
ADC1_6V6: J3.90 U5.M4 | length 0.5
  Bottom Layer w0.2: v1(9.575,10.475) U5.M4
BUZZER_1: J3.4 U5.L2 | length 0.5
  Bottom Layer w0.2: v1(10.225,9.175) U5.L2
CAN1_RX: J3.65 U5.B12 | length 0.5
  Bottom Layer w0.2: U5.B12 v1(16.725,16.325)
CAN1_TX: J3.63 U5.C12 | length 0.5
  Bottom Layer w0.2: U5.C12 v1(16.075,16.325)
CAN2_RX: J3.59 U5.P12
CAN2_TX: J3.57 U5.P13
ETH_CRS_DV: J4.7 U5.R3
ETH_MDC: J4.4 U5.M3
ETH_MDIO: J4.2 U5.P2 | length 0.5
  Bottom Layer w0.2: v1(8.275,9.175) U5.P2
ETH_POWER_EN: J4.6 U5.B7 | length 0.5
  Bottom Layer w0.2: U5.B7 v1(16.725,12.425)
ETH_REF_CLK: J4.3 U5.N2
ETH_RXD0: J4.11 U5.N5
ETH_RXD1: J4.15 U5.P5
ETH_TX_EN: J4.27 U5.R13
ETH_TXD0: J4.19 U5.A8
ETH_TXD1: J4.23 U5.B8
FMU_CAP1: J3.97 U5.P10
FMU_CH1: J3.17 U5.E14
FMU_CH2: J3.15 U5.K12 | length 0.5
  Bottom Layer w0.2: v1(10.875,16.325) U5.K12
FMU_CH3: J3.13 U5.L12 | length 0.5
  Bottom Layer w0.2: v1(10.225,16.325) U5.L12
FMU_CH4: J3.11 U5.L13 | length 0.5
  Bottom Layer w0.2: v1(10.225,16.975) U5.L13
FMU_CH5: J3.7 U5.M15
FMU_CH6: J3.5 U5.M14 | length 0.5
  Bottom Layer w0.2: v1(9.575,17.625) U5.M14
FMU_CH7: J3.3 U5.M11 | length 0.5
  Bottom Layer w0.2: v1(9.575,15.675) U5.M11
FMU_CH8: J3.1 U5.M13 | length 0.5
  Bottom Layer w0.2: v1(9.575,16.975) U5.M13
FMU_nRST: J3.87 U5.J1
FMU_nSAFETY_SWITCH_LED_OUT: J3.23 U5.N15
FMU_PPM_INPUT: J3.39 U5.C4 | length 0.5
  Bottom Layer w0.2: U5.C4 v1(16.075,10.475)
FMU_SAFETY_SWITCH_IN: J3.21 U5.K3 | length 0.5
  Bottom Layer w0.2: v1(10.875,9.825) U5.K3
FMU_SWCLK: J3.77 U5.A14
FMU_SWDIO: J3.75 U5.A15 | length 0.5
  Bottom Layer w0.2: U5.A15 v1(17.375,18.275)
FMU_VDD_3V3: C21.2 C22.2 C23.2 C25.2 C28.2 C36.2 C37.2 C40.2 C41.2 C42.2 C43.2 C45.2 C49.2 D1.A FB2.2 FB3.1 J3.84 J3.86 R22.2 R23.2 R25.2 R26.2 R27.2 R28.2 R29.2 R30.2 R37.1 R38.1 R40.1 R41.1 U5.C5 U5.C6 U5.C7 U5.C8 U5.C9 U5.F3 U5.G3 U5.G13 U5.H13 U5.J12 U5.J13 U5.K4 U5.N8 U5.N9 U5.N10 U7.3 U7.7 U7.8 | length 6.4
  Bottom Layer w0.2: v1(8.925,13.725) U5.N8 ; v1(8.925,14.375) U5.N9 ; v1(8.925,15.025) U5.N10 ; v1(10.875,10.475) U5.K4 ; v1(11.525,16.325) U5.J12 ; v1(11.525,16.975) U5.J13 ; v1(12.175,16.975) U5.H13 ; U5.G3 v1(13.475,9.825) ; U5.G13 v1(13.475,16.975) ; U5.F3 v1(14.125,9.825) ; v1(15.425,13.075) U5.C8 ; U5.C5 v1(16.075,11.125) ; U5.C6 v1(16.075,11.775) ; U5.C7 v1(16.075,12.425)
FMU_VDD_5V: C14.3 C15.2 C16.2 C17.2 C29.2 U9.1 U11.1 U11.5
GND: BT1.2 C1.2 C2.1 C5.1 C6.1 C7.1 C11.1 C12.1 C13.1 C14.2 C15.1 C16.1 C17.1 C18.1 C19.1 C20.1 C21.1 C22.1 C23.1 C24.1 C25.1 C26.2 C27.1 C28.1 C29.1 C30.1 C31.1 C33.1 C35.1 C36.1 C37.1 C38.1 C39.1 C40.1 C41.1 C42.1 C43.1 C44.1 C45.1 C46.1 C47.1 C48.1 C49.1 C50.1 C51.1 C52.1 C53.1 J1.6 J1.MP1 J1.MP2 J1.MP3 J1.MP4 J2.1 J2.8 J2.15 J2.18 J2.23 J2.26 J2.34 J2.M1 J2.M2 J2.M3 J2.M4 J3.2 J3.6 J3.9 J3.19 J3.20 J3.26 J3.31 J3.32 J3.38 J3.41 J3.43 J3.44 J3.45 J3.47 J3.50 J3.56 J3.61 J3.62 J3.67 J3.68 J3.73 J3.74 J3.79 J3.82 J3.88 J3.94 J3.95 J3.99 J3.100 J3.M1 J3.M2 J3.M3 J3.M4 J4.1 J4.5 J4.8 J4.9 J4.13 J4.16 J4.17 J4.21 J4.25 J4.29 J4.37 J4.46 J4.M1 J4.M2 J4.M3 J4.M4 Q1.2 Q2.2 R1.2 R2.2 R3.2 R6.1 R7.2 R9.2 R10.1 R11.1 R13.1 R15.1 R17.1 R19.1 R20.1 R24.1 U2.2 U3.2 U4.2 U5.D5 U5.D7 U5.D8 U5.D9 U5.F2 U5.F6 U5.F7 U5.F8 U5.F9 U5.F10 U5.F12 U5.G2 U5.G6 U5.G7 U5.G8 U5.G9 U5.G10 U5.G12 U5.H6 U5.H7 U5.H8 U5.H9 U5.H10 U5.H12 U5.J6 U5.J7 U5.J8 U5.J9 U5.J10 U5.K6 U5.K7 U5.K8 U5.K9 U5.K10 U5.L4 U5.M1 U5.M8 U5.M9 U5.N1 U6.19 U6.EP U7.4 U8.2 U9.10 U11.10 U13.3 U13.6 U13.8 U13.9 U14.6 U14.7 X1.2 X1.4 | length 17.5
  Bottom Layer w0.2: v1(9.575,8.525) U5.M1 ; v1(9.575,13.725) U5.M8 ; v1(9.575,14.375) U5.M9 ; v1(10.225,10.475) U5.L4 ; v1(10.875,11.775) U5.K6 ; v1(10.875,12.425) U5.K7 ; v1(10.875,13.725) U5.K8 ; v1(10.875,14.375) U5.K9 ; v1(10.875,15.025) U5.K10 ; v1(11.525,11.775) U5.J6 ; v1(11.525,12.425) U5.J7 ; v1(11.525,13.725) U5.J8 ; v1(11.525,14.375) U5.J9 ; v1(11.525,15.025) U5.J10 ; v1(12.175,11.775) U5.H6 ; v1(12.175,12.425) U5.H7 ; v1(12.175,13.725) U5.H8 ; v1(12.175,14.375) U5.H9 ; v1(12.175,15.025) U5.H10 ; v1(12.175,16.325) U5.H12 ; U5.G2 v1(13.475,9.175) ; U5.G6 v1(13.475,11.775) ; U5.G7 v1(13.475,12.425) ; U5.G8 v1(13.475,13.725) ; U5.G9 v1(13.475,14.375) ; U5.G10 v1(13.475,15.025) ; U5.G12 v1(13.475,16.325) ; U5.F2 v1(14.125,9.175) ; U5.F6 v1(14.125,11.775) ; U5.F7 v1(14.125,12.425) ; U5.F8 v1(14.125,13.725) ; U5.F9 v1(14.125,14.375) ; U5.F10 v1(14.125,15.025) ; U5.F12 v1(14.125,16.325) ; U5.D5 v1(15.425,11.125) ; U5.D7 v1(15.425,12.425) ; U5.D8 v1(15.425,13.725) ; U5.D9 v1(15.425,14.375)
HEATER: J2.30 U5.R12
HW_REV_SENSE: R41.2 R42.1 U5.H4 | length 0.5
  Bottom Layer w0.2: v1(12.175,10.475) U5.H4
HW_VER_REV_DRIVE: J3.25 R42.2 U5.N7 | length 0.5
  Bottom Layer w0.2: v1(8.925,12.425) U5.N7
HW_VER_SENSE: J3.27 U5.G4 | length 0.5
  Bottom Layer w0.2: U5.G4 v1(13.475,10.475)
I2C1_SCL_BASE_GPS1_MAG_LED_PM1: J3.18 R22.1 U5.A5
I2C1_SDA_BASE_GPS1_MAG_LED_PM1: J3.16 R23.1 U5.B4 | length 0.5
  Bottom Layer w0.2: U5.B4 v1(16.725,10.475)
I2C2_DRDY1_BMP388: U5.K13 U13.7 | length 0.5
  Bottom Layer w0.2: v1(10.875,16.975) U5.K13
I2C2_SCL_BASE_GPS2_MAG_LED_PM2: J3.14 R26.1 U5.H3 U13.2 | length 0.5
  Bottom Layer w0.2: v1(12.175,9.825) U5.H3
I2C2_SDA_BASE_GPS2_MAG_LED_PM2: J3.12 R25.1 U5.E2 U13.4 | length 0.5
  Bottom Layer w0.2: U5.E2 v1(14.775,9.175)
I2C3_SCL_EXTERNAL1: J3.10 R27.1 U5.F15
I2C3_SDA_EXTERNAL1: J3.8 R28.1 U5.M12 | length 0.5
  Bottom Layer w0.2: v1(9.575,16.325) U5.M12
I2C4_SCL_FMU: J2.7 R29.1 U5.R7 U6.10
I2C4_SDA_FMU: J2.5 R30.1 U5.P7 U6.9 | length 0.5
  Bottom Layer w0.2: v1(8.275,12.425) U5.P7
nARMED: J3.85 U5.B3 | length 0.5
  Bottom Layer w0.2: U5.B3 v1(16.725,9.825)
NetC18_2: C18.2 C38.2 FB2.1 R8.2 U11.6 U11.7 U11.8
NetC19_2: C19.2 U5.F1 Y1.1
NetC20_2: C20.2 U5.E1 Y1.2
NetC24_2: C24.2 U5.G1 X1.1
NetC26_1: C26.1 U5.F13 | length 0.5
  Bottom Layer w0.2: U5.F13 v1(14.125,16.975)
NetC27_2: C27.2 U5.M10 | length 0.5
  Bottom Layer w0.2: v1(9.575,15.025) U5.M10
NetC30_2: C30.2 C31.2 FB1.1 R5.2 U9.6 U9.7 U9.8
NetC39_2: C39.2 U5.H1 X1.3
NetC44_2: C44.2 C46.2 FB3.2 U5.P1 U5.R1 | length 0.9
  Bottom Layer w0.2: v1(7.625,8.525) U5.R1 ; v1(8.275,8.525) U5.P1
NetC47_2: C47.2 FB4.1 R31.2 U6.12
NetC48_2: C48.2 R43.2 R44.2 R45.2 U6.15 U6.18
NetD1_C: D1.C R21.1
NetD2_A: D2.A R37.2
NetD3_A: D3.A R38.2
NetD4_A: D4.A R40.2
NetQ1_3: Q1.3 R31.1 U6.11
NetQ2_3: Q2.3 R39.1 U14.9
NetR5_1: R5.1 R6.2 U9.9
NetR8_1: R8.1 R10.2 U11.9
NetR24_2: R24.2 U5.D6 | length 0.5
  Bottom Layer w0.2: U5.D6 v1(15.425,11.775)
NetR43_1: R43.1 U6.3
NetR44_1: R44.1 U6.13
NetR45_1: R45.1 U6.14
NFC_GPIO: J4.48 U5.M2
nLED_BLUE: D4.K U5.B2 | length 0.5
  Bottom Layer w0.2: U5.B2 v1(16.725,9.175)
nLED_GREEN: D3.K U5.B1
nLED_RED: D2.K U5.A1 | length 0.5
  Bottom Layer w0.2: U5.A1 v1(17.375,8.525)
nPOWER_IN_A: J3.89 U5.M7 | length 0.5
  Bottom Layer w0.2: v1(9.575,12.425) U5.M7
nPOWER_IN_B: J3.91 U5.L15
nPOWER_IN_C: J3.93 U5.K15
PG6: J4.44 U5.J15
SCALED_V5: R18.1 R19.2 U5.R4
SCALED_VDD_3V3_SENSORS1: R4.1 R11.2 U5.N3
SCALED_VDD_3V3_SENSORS2: R12.1 R13.2 U5.N4
SCALED_VDD_3V3_SENSORS3: R14.1 R15.2 U5.R5
SCALED_VDD_3V3_SENSORS4: R16.1 R17.2 U5.P6
SDMMC2_CLK: J1.5 U5.B11
SDMMC2_CMD: J1.3 R34.1 U5.A11
SDMMC2_D0: J1.7 R35.1 U5.R14
SDMMC2_D1: J1.8 R36.1 U5.R15 | length 0.5
  Bottom Layer w0.2: v1(7.625,18.275) U5.R15
SDMMC2_D2: J1.1 R32.1 U5.B9
SDMMC2_D3: J1.2 R33.1 U5.A9
SE050_EN: Q1.1 U5.L14 | length 0.5
  Bottom Layer w0.2: v1(10.225,17.625) U5.L14
SENSORS_VDD_5V: C1.3 C5.2 C6.2 C7.2 C33.2 U2.1 U3.1 U4.1 U8.1
SPI1_DRDY1_BMI330: U5.H2 U14.4 | length 0.5
  Bottom Layer w0.2: v1(12.175,9.175) U5.H2
SPI1_MISO_SENSOR1_BMI330: U5.C10 U14.1
SPI1_MOSI_SENSOR1_BMI330: U5.A6 U14.14
SPI1_nCS1_BMI330: U5.D3 U14.12 | length 0.5
  Bottom Layer w0.2: U5.D3 v1(15.425,9.825)
SPI1_SCK_SENSOR1_BMI330: U5.P4 U14.13
SPI2_DRDY2_ISM330_INT2: J2.31 U5.D15
SPI2_MISO_SENSOR2_ISM330: J2.22 U5.C14
SPI2_MOSI_SENSOR2_ISM330: J2.24 U5.C13
SPI2_nCS1_ISM330: J2.33 U5.J4 | length 0.5
  Bottom Layer w0.2: v1(11.525,10.475) U5.J4
SPI2_SCK_SENSOR2_ISM330: J2.20 U5.D14
SPI3_DRDY1_BMI088_INT1_ACCEL: TP1.1 U5.C3 | length 0.5
  Bottom Layer w0.2: U5.C3 v1(16.075,9.825)
SPI3_DRDY2_BMI088_INT3_GYRO: J2.3 U5.C2 | length 0.5
  Bottom Layer w0.2: U5.C2 v1(16.075,9.175)
SPI3_MISO_SENSOR3_BMI088: J2.12 U5.B13
SPI3_MOSI_SENSOR3_BMI088: J2.14 U5.M6 | length 0.5
  Bottom Layer w0.2: U5.M6 v1(10.225,12.425)
SPI3_nCS1_BMI088_ACCEL: J2.2 U5.D4 | length 0.5
  Bottom Layer w0.2: U5.D4 v1(15.425,10.475)
SPI3_nCS2_BMI088_GYRO: J2.4 U5.D2 | length 0.5
  Bottom Layer w0.2: U5.D2 v1(15.425,9.175)
SPI3_SCK_SENSOR3_BMI088: J2.10 U5.B14
SPI4_DRDY1: J4.18 U5.J2
SPI4_MISO_SENSOR4: J4.12 U5.N11 | length 0.5
  Bottom Layer w0.2: v1(8.925,15.675) U5.N11
SPI4_MOSI_SENSOR4: J4.14 U5.P11 | length 0.5
  Bottom Layer w0.2: v1(8.275,15.675) U5.P11
SPI4_nCS1: J4.20 U5.D13
SPI4_SCK_SENSOR4: J4.10 U5.R10
SPI5_MISO_FRAM: U5.N12 U7.2 | length 0.5
  Bottom Layer w0.2: v1(8.925,16.325) U5.N12
SPI5_MOSI_FRAM: U5.R6 U7.5
SPI5_nCS1_FRAM: U5.J14 U7.1 | length 0.5
  Bottom Layer w0.2: v1(11.525,17.625) U5.J14
SPI5_SCK_FRAM: U5.K1 U7.6
SPI6_DRDY1_EXTERNAL1: J4.47 U5.N14 | length 0.5
  Bottom Layer w0.2: v1(8.925,17.625) U5.N14
SPI6_DRDY2_EXTERNAL1: J4.45 U5.N13 | length 0.5
  Bottom Layer w0.2: v1(8.925,16.975) U5.N13
SPI6_MISO_EXTERNAL1: J4.31 U5.P3
SPI6_MOSI_EXTERNAL1: J4.33 U5.A7
SPI6_nCS1_EXTERNAL1: J4.41 U5.E3 | length 0.5
  Bottom Layer w0.2: U5.E3 v1(14.775,9.825)
SPI6_nCS2_EXTERNAL1: J4.43 U5.A13
SPI6_nRESET_EXTERNAL1: J4.39 U5.L1
SPI6_SCK_EXTERNAL1: J4.35 U5.A10
SPIX_SYNC: J4.49 Q2.1 U5.P9
TRACECLK: TP2.1 U5.A2
UART4_RX: J3.96 U5.E13
UART4_TX: J3.98 U5.E12 | length 0.5
  Bottom Layer w0.2: U5.E12 v1(14.775,16.325)
UART5_CTS_TELEM2: J3.60 U5.F14 | length 0.5
  Bottom Layer w0.2: U5.F14 v1(14.125,17.625)
UART5_RTS_TELEM2: J3.58 U5.G14 | length 0.5
  Bottom Layer w0.2: U5.G14 v1(13.475,17.625)
UART5_RX_TELEM2: J3.54 U5.D12 | length 0.5
  Bottom Layer w0.2: U5.D12 v1(15.425,16.325)
UART5_TX_TELEM2: J3.52 U5.A12
UART7_CTS_TELEM1: J3.24 U5.R9
UART7_RTS_TELEM1: J3.22 U5.L3 | length 0.5
  Bottom Layer w0.2: v1(10.225,9.825) U5.L3
UART7_RX_TELEM1: J3.66 U5.K2
UART7_TX_TELEM1: J3.64 U5.P8 | length 0.5
  Bottom Layer w0.2: v1(8.275,13.725) U5.P8
UART8_RX_GPS2: J3.30 U5.A4
UART8_TX_GPS2: J3.28 U5.A3
USART1_RX_GPS1: J3.34 U5.B5 | length 0.5
  Bottom Layer w0.2: U5.B5 v1(16.725,11.125)
USART1_TX_GPS1: J3.36 U5.B6 | length 0.5
  Bottom Layer w0.2: U5.B6 v1(16.725,11.775)
USART2_CTS_TELEM3: J3.48 U5.D11 | length 0.5
  Bottom Layer w0.2: U5.D11 v1(15.425,15.675)
USART2_RTS_TELEM3: J3.46 U5.D10 | length 0.5
  Bottom Layer w0.2: U5.D10 v1(15.425,15.025)
USART2_RX_TELEM3: J3.42 U5.R2
USART2_TX_TELEM3: J3.40 U5.C11
USART3_RX_DEBUG: J3.71 U5.P14
USART3_TX_DEBUG: J3.69 U5.P15
USART6_RX_FROM_IO__RC_INPUT: J3.70 U5.G15
USART6_TX_TO_IO__NC: J3.72 U5.H15
USB_D_N: J3.78 U5.C15
USB_D_P: J3.76 U5.B15
V_RTC_BAT: BT1.1 J3.29 R21.2 U5.C1
VBUS_SENSE: J3.80 U5.E15
VDD_3V3_SD_CARD: C2.2 FB1.2 J1.4 R20.2 R32.2 R33.2 R34.2 R35.2 R36.2
VDD_3V3_SD_CARD_EN: R9.1 U5.D1 U9.5
VDD_3V3_SENSORS1: C35.2 C52.2 C53.2 R4.2 R39.2 U8.5 U14.5 U14.8
VDD_3V3_SENSORS1_EN: R7.1 U5.E4 U8.3 | length 0.5
  Bottom Layer w0.2: U5.E4 v1(14.775,10.475)
VDD_3V3_SENSORS2: C11.2 C50.2 C51.2 J2.32 R12.2 U2.5 U13.1 U13.5 U13.10
VDD_3V3_SENSORS2_EN: R1.1 U2.3 U5.J3 | length 0.5
  Bottom Layer w0.2: v1(11.525,9.825) U5.J3
VDD_3V3_SENSORS3: C12.2 J2.6 R14.2 U3.5
VDD_3V3_SENSORS3_EN: R2.1 U3.3 U5.R8
VDD_3V3_SENSORS4: C13.2 FB4.2 J2.16 R16.2 U4.5
VDD_3V3_SENSORS4_EN: R3.1 U4.3 U5.H14 | length 0.5
  Bottom Layer w0.2: v1(12.175,17.625) U5.H14
VDD_3V3_SPEKTRUM_POWER_EN: J3.33 U5.F4 | length 0.5
  Bottom Layer w0.2: U5.F4 v1(14.125,10.475)
VDD_5V_HIPOWER_nEN: J3.81 U5.B10
VDD_5V_HIPOWER_nOC: J3.83 U5.N6
VDD_5V_IN: C1.1 C14.1 J2.28 J3.49 J3.51 J3.53 J3.55 R18.2
VDD_5V_PERIPH_nEN: J3.35 U5.K14 | length 0.5
  Bottom Layer w0.2: v1(10.875,17.625) U5.K14
VDD_5V_PERIPH_nOC: J3.37 U5.R11
pads on no net: J1.9 J1.14 J1.15 J2.9 J2.11 J2.13 J2.17 J2.19 J2.21 J2.25 J2.27 J2.29 J4.22 J4.24 J4.26 J4.28 J4.30 J4.32 J4.34 J4.36 J4.38 J4.40 J4.42 J4.50 U2.4 U3.4 U4.4 U6.1 U6.2 U6.4 U6.5 U6.6 U6.7 U6.8 U6.16 U6.17 U6.20 U8.4 U9.2 U9.3 U9.4 U11.2 U11.3 U11.4 U14.2 U14.3 U14.10 U14.11